# Altium PCB Shield_PCB.PcbDoc
Units mil, origin at the board's own origin, x right, y up, seen from the top; angles counter-clockwise.
Board outline 2762.03 x 3428.03 mil, 2 copper layers (Top Layer, Bottom Layer); 11 components, 18 nets, 73 pads, 66 vias.
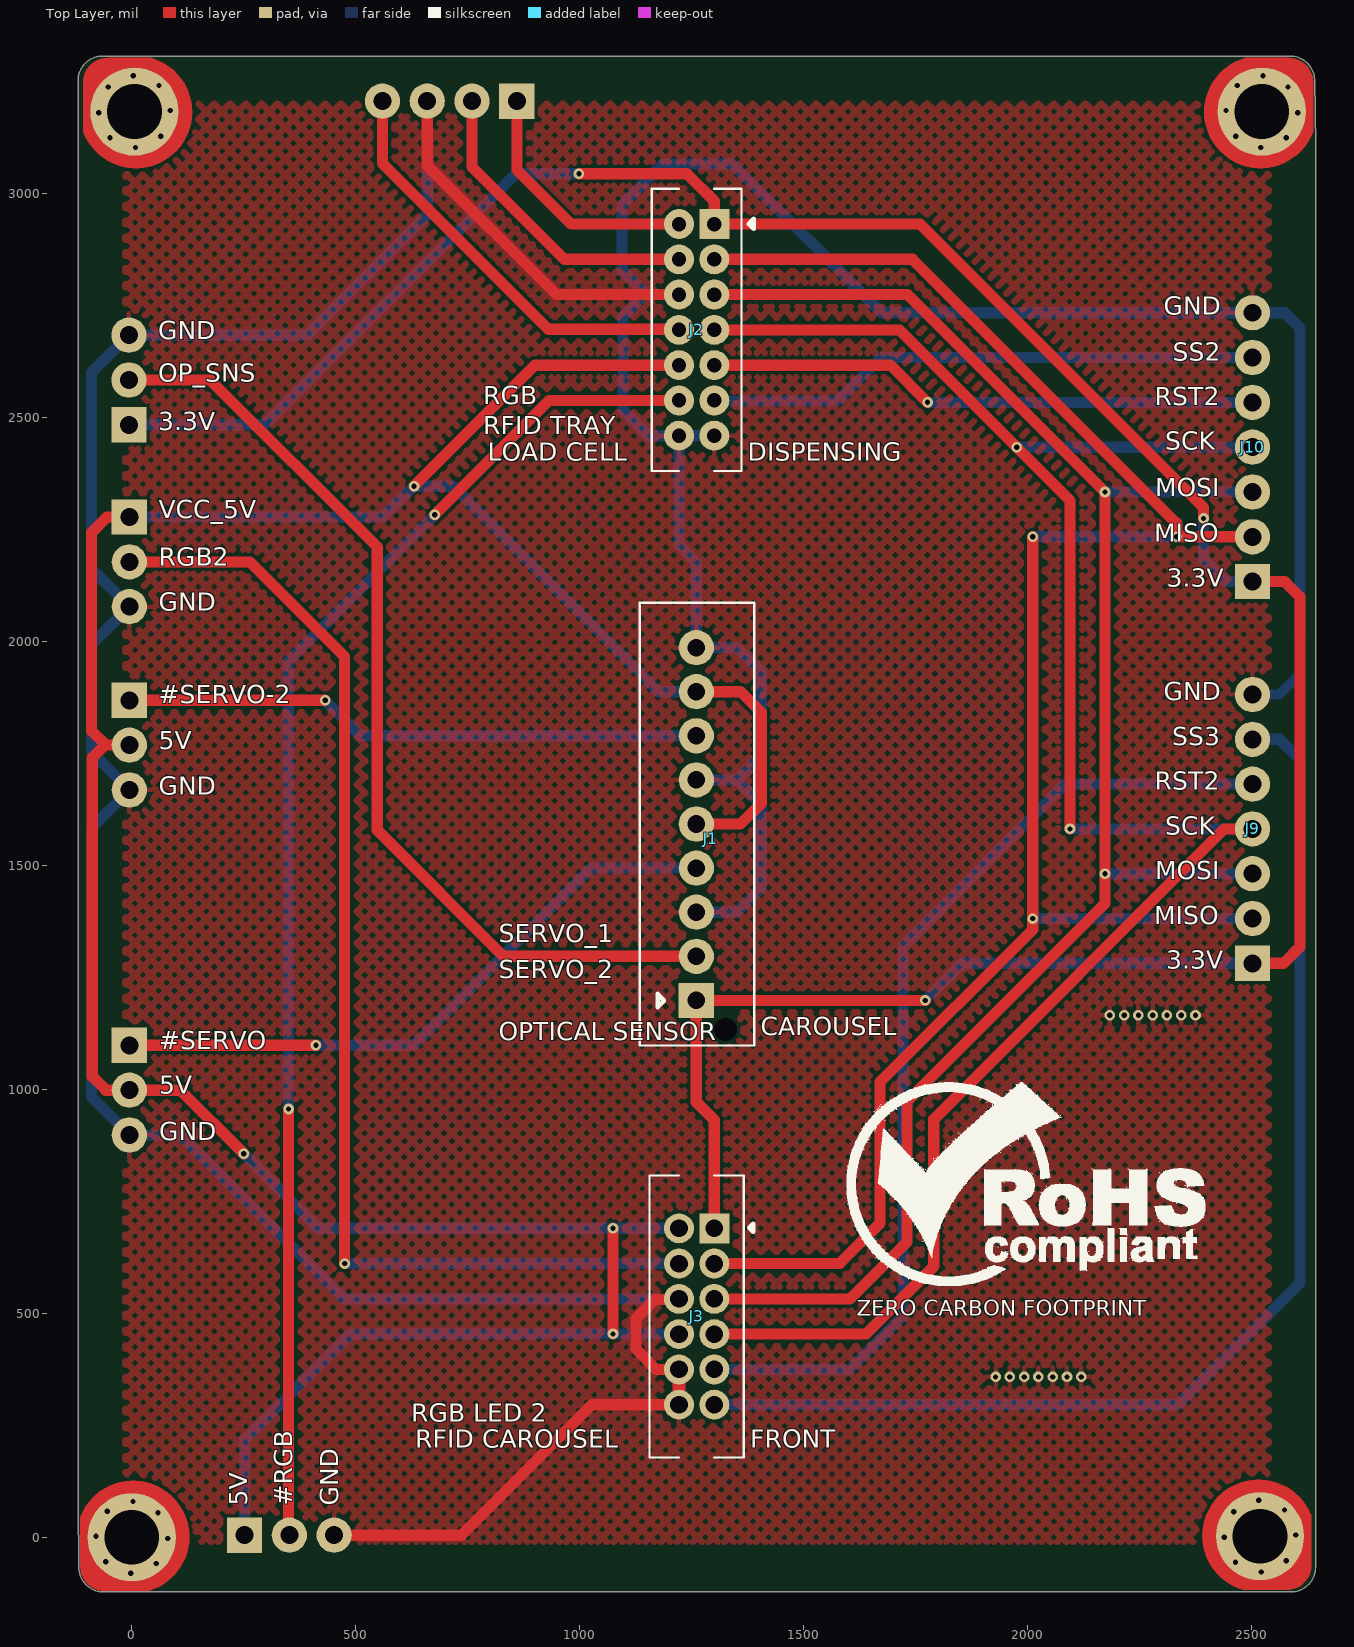
[diagram p0: Top Layer view]
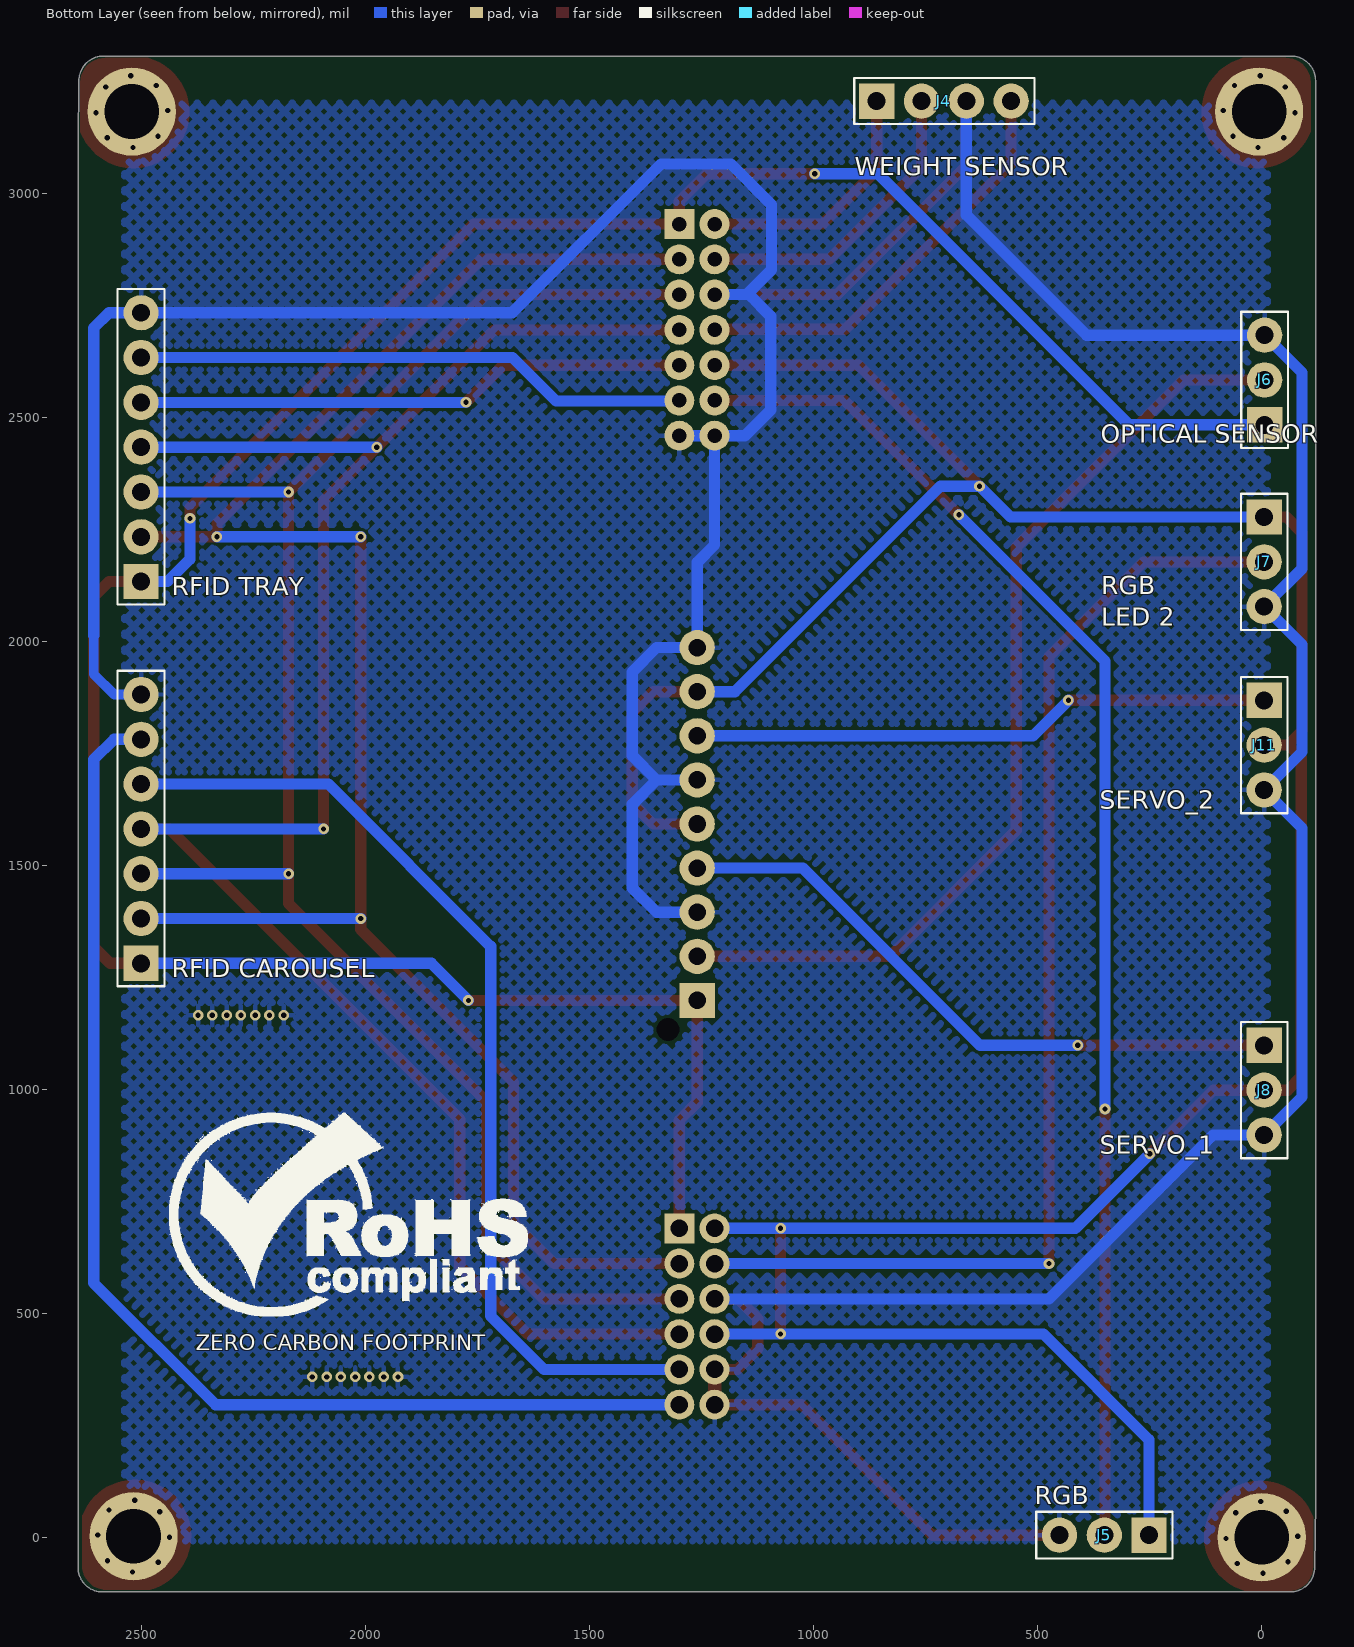
[diagram p1: Bottom Layer view, seen from below]
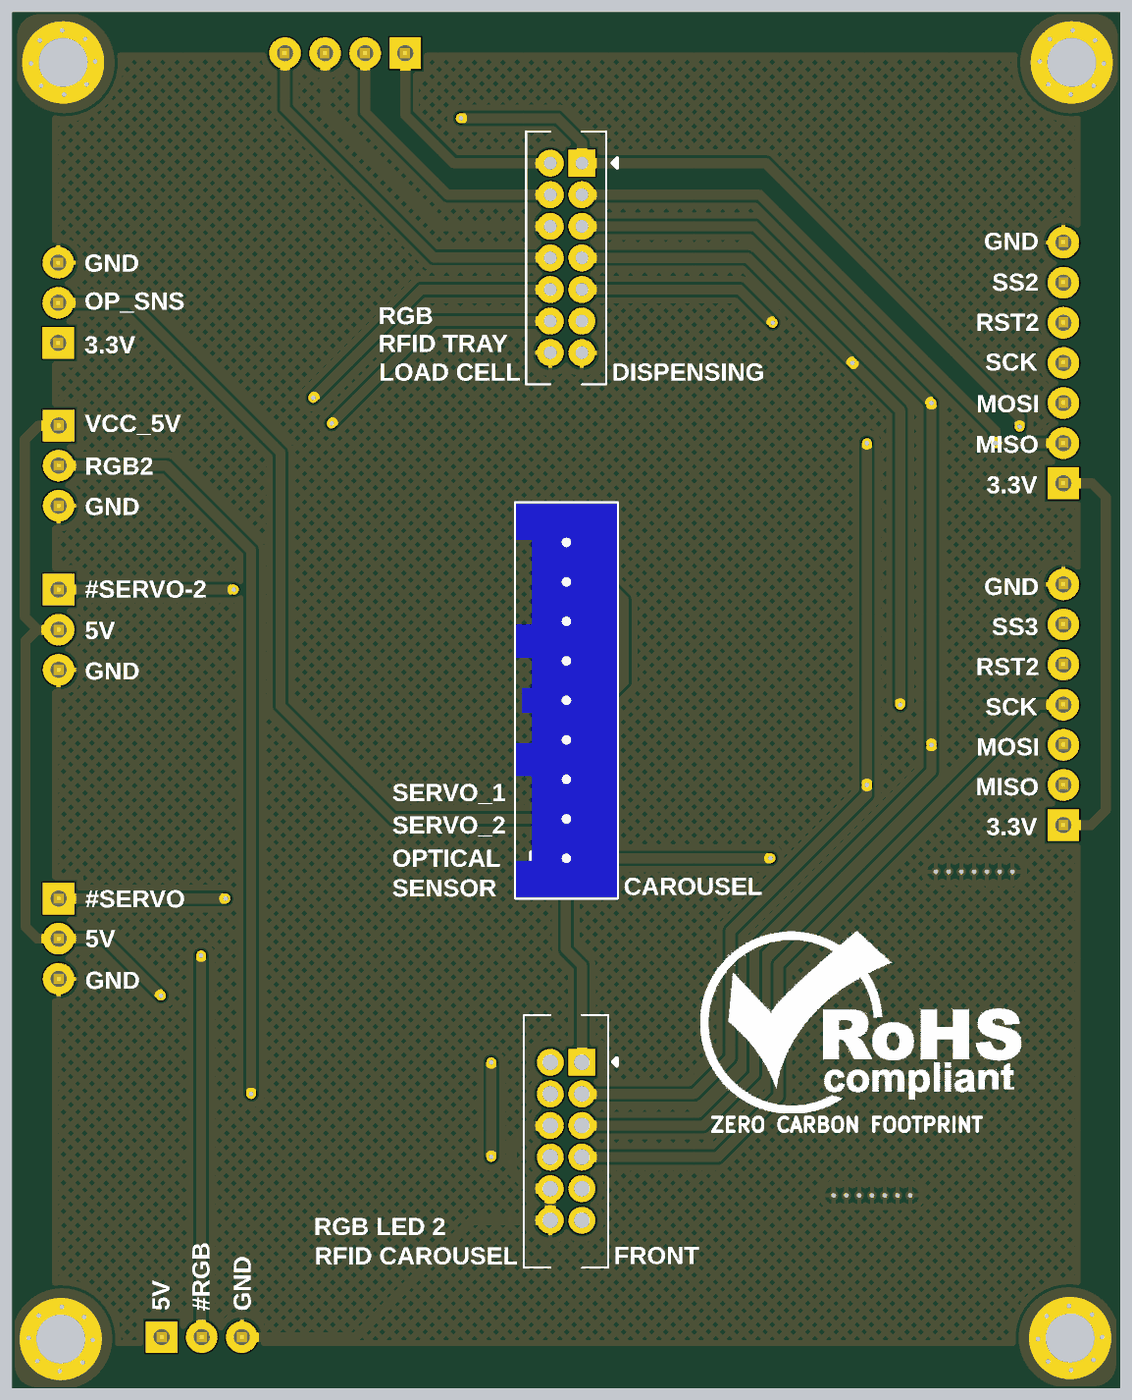
[diagram p2: 3D render of the assembled board from above, using the file's embedded part models]
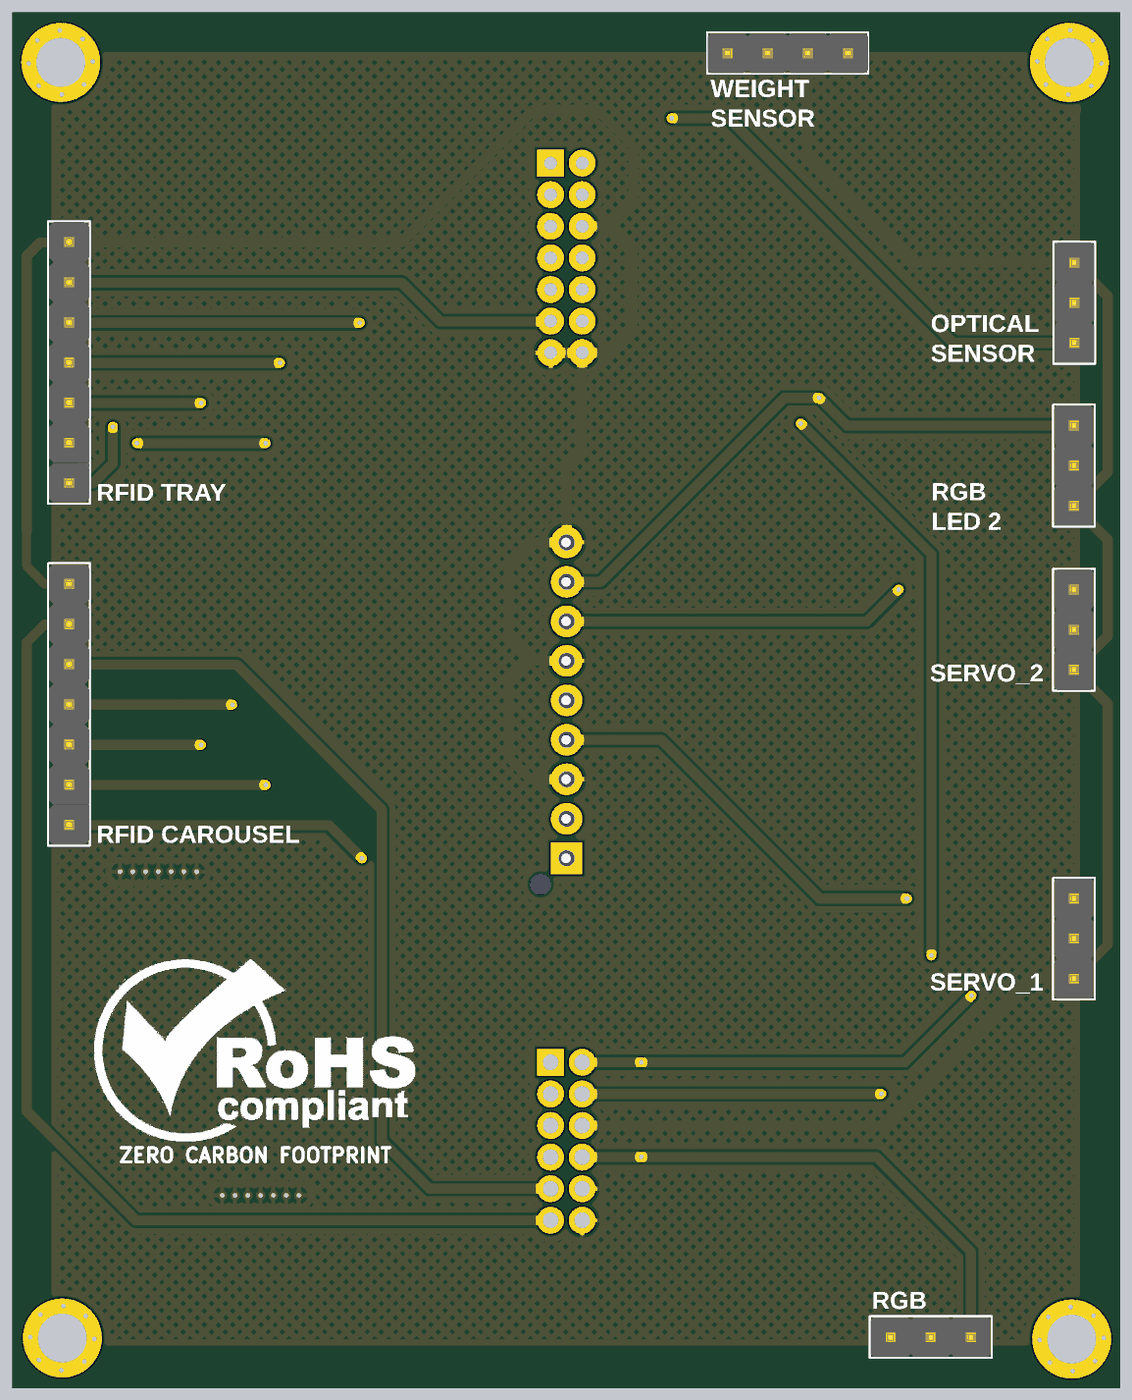
[diagram p3: 3D render of the assembled board from below, using the file's embedded part models]

## Layer stack, top to bottom
Top Solder: solder mask 0.4, Solder Resist, Dk 3.5
Top Layer: signal copper 1.4
Dielectric 1: dielectric 12.6, FR-4, Dk 4.8
Bottom Layer: signal copper 1.4
Bottom Solder: solder mask 0.4, Solder Resist, Dk 3.5

## Board outline
-118.01,-66.07 -120.01,75.92 cw(c-115,76) -120.01,75.93 -120.01,75.92 -120.01,75.93 cw(c-115,76) -120.02,76 -120.02,3251 cw(c-65,3251) -65,3306.02 2585,3306.02 cw(c2585,3251) 2639.94,3253.86 cw(c2635,3253) 2640.01,3253.07 2642.01,3108.08 cw(c2637,3108) 2642.01,3108 2642.01,-67 2642.02,-67 ccw(c2637,-67) 2642.01,-66.97 2642.02,-67 cw(c2587,-67) 2587,-122.02 cw(c2587,-117) 2586,-121.91 cw(c2585,-117) 2585,-122.02 -63,-122.02 cw(c-63,-67) -118.02,-67 cw(c-113,-67) -117.99,-66.5 cw(c-113,-66)

## Design rules (kind name [scope] priority, off if disabled: settings)
Clearance [All] p1: gap=7 ignorepadtopadclearanceinfootprint=FALSE
ComponentClearance [All] p1: gap=0 collisioncheckmode=3 verticalgap=0 showdistances=FALSE
HoleSize [All] p1: absolutevalues=TRUE maxlimit=1000 minlimit=1 maxpercent=80.000 minpercent=20.000
HoleToHoleClearance [All] p1: gap=0 allowstackedmicrovias=TRUE
MinimumSolderMaskSliver [All] p1: minsoldermaskwidth=0
PolygonConnect [All] p1: connectstyle=Relief reliefconductorwidth=10 reliefentries=4 polygonreliefangle="90 Angle" airgapwidth=10
RoutingVias [All] p1: holewidth=11.81 width=23.62 viastyle="Through Hole" minholewidth=11.81 minwidth=23.62 maxholewidth=11.81 maxwidth=23.62
SilkToSilkClearance [All] p1: silktosilkclearance=0
SilkToSolderMaskClearance [IsPad] p1: minsilkscreentomaskgap=0 clearancetoexposedcopper=TRUE
SolderMaskExpansion [All] p1: expansion=4 istentingtop=FALSE
Width [All] p1: maxlimit=50 minlimit=10 preferedwidth=22 minimp=50.000000 maximp=50.000000 favimp=50.000000
24 further rules are at their usual default settings.

## Components (designator, comment, footprint, x,y, rotation, side; value= is the part's Value field where it differs from the comment)
J1 "B09B-XASK-1-A(LF)(SN)" B09B-XASK-1-A(LF)(SN) 1292.5,1565.8 r270 top locked
J2 "PHD-2*7A" PHD-2*7A 1300,2931 r90 top locked
J3 "X2026WV-2x06A-N0SN" X2026WV-2x06A-N0SN 1300,689.7 r90 top locked
J4 "HDR_M_1X4" HDR_M_1X4 859.43,3205.18 r180 bottom locked
J5 "HDR_M_1X3" HDR_M_1X3 351.59,4.84 r0 bottom locked
J6 "HDR_M_1X3" HDR_M_1X3 -6.33,2583 r90 bottom locked
J7 "HDR_M_1X3" HDR_M_1X3 -5.33,2177 r270 bottom locked
J8 "HDR_M_1X3" HDR_M_1X3 -5.33,998 r270 bottom locked
J9 "HDR_M_1X7" HDR_M_1X7 2501.23,1281 r90 top locked
J10 "HDR_M_1X7" HDR_M_1X7 2501.23,2133 r90 top locked
J11 "HDR_M_1X3" HDR_M_1X3 -5.33,1768 r270 bottom locked

## Footprints (in the part's own frame and the unit in brackets; to place one, negate y for a bottom-side part, rotate by r counter-clockwise, add the part's x,y. Pads: shape width x height; smd on the part's side, far side on the other; paste and mask are expansions set on the pad)
B09B-XASK-1-A(LF)(SN) [mm]
  rect 2x2 hole 1: 1(9.335,-0.825)
  round 2 hole 1: 2(6.834,-0.825) 3(4.334,-0.825) 4(1.834,-0.825) 5(-0.666,-0.826) 6(-3.166,-0.826) 7(-5.666,-0.826) 8(-8.166,-0.826) 9(-10.666,-0.826)
  round 0 hole 1.3 unplated: MH1(10.986,0.826)
  silkscreen extent -13.21,-4.04 11.89,2.46, body extent -13.16,-3.99 11.84,2.41, height 8.8
HDR_M_1X3 [mm] "2.54mm spacer header"
  rect 2x2 hole 1.02: 1(-2.54,0)
  round 2 hole 1.02: 2(0,0) 3(2.54,0)
  silkscreen extent -3.86,-1.32 3.86,1.32, body extent -3.81,-1.27 3.81,1.27, height 11.93
HDR_M_1X4 [mm] "2.54mm spacer header"
  rect 2x2 hole 1.02: 1(0,0)
  round 2 hole 1.02: 2(2.54,0) 3(5.08,0) 4(7.62,0)
  silkscreen extent -1.27,-1.3 8.94,1.32, body extent -1.25,-1.27 8.92,1.27, height 11.93
HDR_M_1X7 [mm] "2.54mm Board Spacer Pin Header"
  rect 2x2 hole 1.02: 1(0,0)
  round 2 hole 1.02: 2(2.54,0) 3(5.08,0) 4(7.62,0) 5(10.16,0) 6(12.7,0) 7(15.24,0)
  body extent -1.25,-1.27 16.54,1.27, height 2.77
PHD-2*7A [mm]
  rect 1.7x1.7 hole 0.82: 1(0,0)
  round 1.7 hole 0.82: 2(-2,0) 3(-4,0) 4(-6,0) 5(-8,0) 6(-10,0) 7(-12,0) 8(0,2) 9(-2,2) 10(-4,2) 11(-6,2) 12(-8,2) 13(-10,2) 14(-12,2)
  silkscreen extent -14,-2.24 2,3.54
X2026WV-2x06A-N0SN [mm]
  rect 1.7x1.7 hole 1: 1(0,0)
  round 1.7 hole 1: 2(0,2) 3(-2,0) 4(-2,2) 5(-4,0) 6(-4,2) 7(-6,0) 8(-6,2) 9(-8,0) 10(-8,2) 11(-10,0) 12(-10,2)
  silkscreen extent -13,-2.21 3,3.67

## Part data
J1: "CONN HEADER VERT 9POS 2.5MM", Current Rating=3A, Manufacturer=JST, Max Operating Temperature=85°C, Min Operating Temperature=-25°C, Supplier Part Number 1=455-4123-ND, Category=Connectors, Contact Plating=Copper,Tin,Lead, Height=8.8mm, Length=25mm, Manufacturer Part Number=B09B-XASK-1-A(LF)(SN), Number of Poles=9, Pitch=2.5mm, Pricing 1="1=0.50000, 10=0.43900, 100=0.36160, 500=0.31446, 1000=0.25942, 5000=0.22798, 10000=0.21226 (USD)", RoHS=Yes, Shape=Straight, Supplier 1=Digi-Key, Width=6.4mm
J2: "2x7P 2 PHD 2mm 2mm 7 Phosphor bronze Plugin,P=2mm Wire To Board / Wire To Wire Connector ROHS", Manufacturer=BOOMELE, Package=Custom, ComponentLink1Description=LCSC, ComponentLink1URL=https://lcsc.com/product-detail/Wire-To-Board-Wire-To-Wire-span-style-background-color-ff0-Connector-span_BOOMELE-Boom-Precision-Elec-PHD-2-7A_C40745.html, Manufacturer Part No=PHD-2*7A
J3: "2x6P 2 2mm 2mm 6 Brass Plugin,P=2mm Wire To Board / Wire To Wire Connector ROHS", Manufacturer=XKB-Connectivity, Package=Custom, ComponentLink1Description=LCSC, ComponentLink1URL=https://lcsc.com/product-detail/Wire-To-Board-Wire-To-Wire-span-style-background-color-ff0-Connector-span_XKB-Connectivity-X2026WV-2x06A-N0SN_C725844.html, Manufacturer Part No=X2026WV-2x06A-N0SN
J4: "4 POS 2.54mm spacer header", Current Rating=1Amps, Manufacturer=E-SIMPO, ComponentLink1Description=AliE, ComponentLink1URL=c, Pitch=2.54mm
J5 J6 J7 J8 J11: "3 POS 2.54mm spacer header", Current Rating=1Amps, Manufacturer=E-SIMPO, ComponentLink1Description=AliE, ComponentLink1URL=https://www.aliexpress.com/item/32896225776.html?spm=a2g0o.productlist.0.0.64116a18Q9OFX2&algo_pvid=aef74b9f-f029-40ba-a87b-4c3df7d87b26&algo_exp_id=aef74b9f-f029-40ba-a87b-4c3df7d87b26-3&pdp_ext_f=%7B%22sku_id%22%3A%2265850500267%22%7D&pdp_pi=-1%3B2.79%3B-1%3BUSD+3.72%40salePrice%3BUSD%3Bsearch-mainSearch, Pitch=2.54mm
J9 J10: "7 POS 2.54mm Board Spacer Pin", Current Rating=1Amps, Manufacturer=E-SIMPO, ComponentLink1Description=AliE, ComponentLink1URL=https://www.aliexpress.com/item/32896225776.html?spm=a2g0o.productlist.0.0.64116a18Q9OFX2&algo_pvid=aef74b9f-f029-40ba-a87b-4c3df7d87b26&algo_exp_id=aef74b9f-f029-40ba-a87b-4c3df7d87b26-3&pdp_ext_f=%7B%22sku_id%22%3A%2265850500267%22%7D&pdp_pi=-1%3B2.79%3B-1%3BUSD+3.72%40salePrice%3BUSD%3Bsearch-mainSearch, Pitch=2.54mm

## Free pads (board coordinates)
  round 196.85 hole 122.05: MH1(6,3182) MH2(2522,3182) MH3(2518,2.51) MH4(0,0)

## Via types
v1: diameter 23.62, hole 11.81, Top Layer to Bottom Layer, 34 vias
v2: diameter 23.62, hole 11.81, Top Layer to Bottom Layer, tented both sides, 32 vias

## Nets (pads, with @x,y where several pads share a name; then routed paths per layer and width w, separated by ;. In a path a pad name is that pad's centre, name@x,y a point inside that pad or via, vN(x,y) a via of type N, cw(c..) or ccw(c..) an arc to the next point about the centre after c; other vN are vias at no path point)
#RGB: J2.13 J5.2 | length 3063.9
  Top Layer w25: v1(350,956) 350,6.43 J5.2 ; v1(676,2282) 931.3,2537.3 J2.13
  Bottom Layer w25: v1(350,956) 350,1956 v1(676,2282)
#RGB2: J3.4 J7.2 | length 2669
  Top Layer w25: J7.2 264,2177 475,1966 v1(475,610.96)
  Bottom Layer w25: v1(475,610.96) J3.4
#SERVO: J1.4 J8.1 | length 1429.2
  Top Layer w25: J8.1 v1(411,1098)
  Bottom Layer w25: v1(411,1098) 629,1098 1024.58,1493.58 J1.4
#SERVO_2: J1.7 J11.1 | length 1298.1
  Top Layer w25: J11.1 v1(431.56,1868)
  Bottom Layer w25: v1(431.56,1868) 510.71,1788.85 J1.7
AVDD#: J2.11 J4.4 | length 954.4
  Top Layer w10: J2.11@1220.04,2696 J2.11
  Top Layer w25: J4.4 559.43,3066.57 930,2696 J2.11@1220.04,2696
GND: J1.3 J1.6 J1.9 J2.7 J2.10 J2.14 J3.6 J3.10 J3.12 J4.3 J5.3 J6.3 J7.3 J8.3 J9.7 J10.7 J11.3 | length 11341.2
  Top Layer w22: J3.6@1219.83,530.8 J3.6
  Top Layer w25: J5.3 735.84,4.84 1027,296 J3.12 ; J4.3 659.43,3061.57 947.48,2773.52 J2.10 ; J3.6@1219.83,530.8 1167.8,530.8 1125,488 1125,420 1170.26,374.74 J3.10
  Top Layer w30: J3.12 J3.10
  Bottom Layer w22: J9.7 2561,1881 2607,1927 2607,2013
  Bottom Layer w25: J4.3 659.43,2951.43 391,2683 J6.3 -90,2599.33 -90,2161.67 J7.3 -90,1992.33 -90,1752.67 J11.3 -90,1583.33 -90,982.67 J8.3 109,898 474.78,532.22 J3.6 ; J2.10 1149.48,2773.52 ; J1.3 1350.57,1395.15 1405,1449.58 1405,1636 1350.57,1690.43 ; J1.6 1350.57,1690.43 ; J2.7 J2.14 ; 2607,2013 2607,2699 2573,2733 J10.7 1673,2733 1341,3065 1185,3065 1094,2974 1094,2829 1149.48,2773.52 ; 1149.48,2773.52 1144.52,2773.52 1096,2725 1096,2516 1153.44,2458.56 J2.14 ; J2.14 1221.26,2214.74 1260,2176 J1.9 1350.57,1985.71 1405,1931.28 1405,1744.86 1350.57,1690.43
  other v1: 1927.87,358 1959.73,358 1991.58,358 2023.44,358 2055.29,358 2087.15,358 2119,358 2182.87,1165 2214.73,1165 2246.58,1165 2278.44,1165 2310.29,1165 2342.15,1165 2374,1165
IN_NA: J2.9 J4.2 | length 693.9
  Top Layer w25: J4.2 759.43,3058.57 965.74,2852.26 J2.9
IN_PA: J2.8 J4.1 | length 565.4
  Top Layer w25: J4.1 859.43,3051.57 980,2931 J2.8
MISO: J2.2 J3.3 J9.2 J10.2 | length 4367.1
  Top Layer w25: J3.3 1579.96,610.96 1670,701 1670,1016 2011,1357 v1(2011,1381) v1(2011,2233) ; J2.2 1742.74,2852.26 2332,2263 v1(2332,2233) J10.2
  Bottom Layer w25: v1(2011,1381) J9.2 ; v1(2011,2233) v1(2332,2233)
MOSI: J2.3 J3.5 J9.3 J10.3 | length 4052.5
  Top Layer w25: J3.5 1603.22,532.22 1730,659 1730,973 2172,1415 v1(2172,1481) v1(2172,2333) 1731.48,2773.52 J2.3
  Bottom Layer w25: v1(2172,1481) J9.3 ; v1(2172,2333) J10.3
OP_SNS: J1.2 J6.2 | length 2169.3
  Top Layer w25: J6.2 175,2583 548,2210 548,1578 829.27,1296.73 J1.2
RST2: J2.5 J10.5 | length 1235.6
  Top Layer w25: J2.5 1692.96,2616.04 v1(1776,2533)
  Bottom Layer w25: v1(1776,2533) J10.5
RST3: J3.9 J9.5 | length 2225.6
  Bottom Layer w25: J3.9 1601.74,374.74 1721,494 1721,1319 2083,1681 J9.5
SCK: J2.4 J3.7 J9.4 J10.4 | length 4478.6
  Top Layer w25: J3.7 1638.48,453.48 1790,605 1790,933 2438,1581 J9.4 ; J2.4 1713.22,2694.78 v1@1972,2436 ; v1(1975,2433) 2094,2314 v1(2094,1581)
  Bottom Layer w10: J10.4@2498.23,2436 J10.4
  Bottom Layer w25: v1(1975,2433) J10.4 ; v1(2094,1581) J9.4
SS2: J2.6 J10.6 | length 1242
  Bottom Layer w10: J2.6 J2.6@1301.3,2536
  Bottom Layer w25: J2.6@1301.3,2536 1575,2536 1672,2633 J10.6
SS3: J3.11 J9.6 | length 2712.1
  Bottom Layer w25: J3.11 2335,296 2607,568 2607,1736 2562,1781 J9.6
VCC_3V3: J1.1 J2.1 J3.1 J6.1 J9.1 J10.1 | length 6036.3
  Top Layer w25: v1(998,3043) 1239,3043 1300,2982 J2.1 1759,2931 2392,2298 v1(2392,2274) ; J3.1 1300,931 1260,971 J1.1 v1(1770.7,1198.3) ; J9.1 2570,1281 2607,1318 2607,2099 2573,2133 J10.1
  Bottom Layer w25: J6.1 296,2483 856,3043 v1(998,3043) ; v1(1770.7,1198.3) 1853.39,1281 J9.1 ; v1(2392,2274) 2392,2183 2442,2133 J10.1
VCC_5V: J1.5 J1.8 J2.12 J3.2 J3.8 J5.1 J7.1 J8.2 J11.2 | length 7080.1
  Top Layer w25: J11.2 -58,1768 ; J7.1 -55,2277 -90,2242 -90,1800 -58,1768 ; J5.1@250,6.43 J5.1 ; v1(250,856) 108,998 J8.2 -58,998 -88,1028 -88,1740 -60,1768 -58,1768 ; v1(630,2346) 900.04,2616.04 J2.12 ; v1(1074,454) v1(1074,689.7) ; J1.5 1358.72,1592 1405,1638.28 1405,1841 1358.72,1887.28 J1.8
  Bottom Layer w22: J1.8@1258.72,1886 J1.8
  Bottom Layer w25: J7.1 561,2277 v1(630,2346) 717,2346 1175.72,1887.28 J1.8 ; v1(250,856) 416.3,689.7 v1(1074,689.7) J3.2 ; J5.1 251.59,217.59 487.48,453.48 J3.8
pads on no net: J1.MH1
copper on no net: | length 73.1
  Bottom Layer w40: 0,0 v2@51.71,-51.71
  other v2: -2.51,-80 2520.51,-77.49 54.8,-58.34 2463.2,-55.83 -58.34,-54.8 2576.34,-52.29 80,-2.51 2438,0 -80,2.51 2598,5.01 58.34,54.8 2459.66,57.3 -54.8,58.34 2572.8,60.85 2.51,80 2515.49,82.51 8.51,3102 2519.49,3102 -48.8,3123.66 2576.8,3123.66 64.34,3127.2 2463.66,3127.2 -74,3179.49 2602,3179.49 86,3184.51 2442,3184.51 -52.34,3236.8 2580.34,3236.8 60.8,3240.34 2467.2,3240.34 3.49,3262 2524.51,3262

## Polygon pours and split planes (outlines as drawn)
no net on Mechanical 2 (solid): 315,-21
GND on Top Layer "Polygon_1" (hatched 45Degree grid 25 track 15, remove dead copper, pour order 0): -14,-9.18 ccw(c-13,-9.18) -13,-10.18 2437,-10.18 ccw(c2437,89.82) 2537,89.82 2537,3196 cw(c2540,3196) 2540,3199 -14,3199 ccw(c-14,3197) -16,3197 -16,3058 ccw(c-14,3058) -14,3056
GND on Bottom Layer "Polygon_2" (hatched 45Degree grid 25 track 15, remove dead copper, pour order 2): -13,-7.18 ccw(c-12,-7.18) -12,-8.18 2438,-8.18 ccw(c2438,91.82) 2538,91.82 2538,3198 cw(c2541,3198) 2541,3201 -13,3201 ccw(c-13,3199) -15,3199 -15,3060 ccw(c-13,3060) -13,3058

## Other copper
Top Layer:
  region: 2632.7,-62.49 2632.7,47.15 ccw(c2627.69,47.15) 2631.33,50.59 ccw(c2515,3.51) 2389.5,3.51 ccw(c2515,3.51) 2480.93,-117.28 ccw(c2482.29,-112.46) 2482.63,-117.46 ccw(c2483.33,-112.49) 2483.33,-117.51 2577.69,-117.51 ccw(c2577.69,-62.49)
  region: -114.7,-65 -114.7,44.64 cw(c-109.69,44.64) -113.33,48.08 cw(c3,1) 128.5,1 cw(c3,1) 37.07,-119.79 cw(c35.71,-114.96) 35.37,-119.97 cw(c34.67,-115) 34.67,-120.02 -59.69,-120.02 cw(c-59.69,-65)
  region: 2636.7,3247 2636.7,3137.36 cw(c2631.69,3137.36) 2635.33,3133.92 cw(c2519,3181) 2393.5,3181 cw(c2519,3181) 2484.93,3301.79 cw(c2486.29,3296.96) 2486.63,3301.97 cw(c2487.33,3297) 2487.33,3302.02 2581.69,3302.02 cw(c2581.69,3247)
  region: -108.7,3247 -108.7,3137.36 ccw(c-103.69,3137.36) -107.34,3133.92 ccw(c9,3181) 134.5,3181 ccw(c9,3181) 43.07,3301.79 ccw(c41.71,3296.96) 41.37,3301.97 ccw(c40.67,3297) 40.67,3302.02 -53.69,3302.02 ccw(c-53.69,3247)

## Silkscreen, mask and mechanical layers (free items; w line width, h text height)
Top Overlay:
  drawing of 3054 lines, arcs and shapes, not listed
  text "GND" at 2303,2715 h70
  text "GND" at 58.67,2660.49 h70
  text "SS2" at 2323,2613 h70
  text "OP_SNS" at 58.96,2566 h70
  text "RGB" at 784,2515.18 h70
  text "RST2" at 2283,2513 h70
  text "3.3V" at 59.19,2457 h70
  text "RFID TRAY" at 784,2448 h70
  text "SCK" at 2306,2414 h70
  text "LOAD CELL" at 794,2389 h70
  text "DISPENSING" at 1375,2389 h70
  text "MOSI" at 2284,2310 h70
  text "VCC_5V" at 60,2261 h70
  text "MISO" at 2282,2209 h70
  text "RGB2" at 60,2154.73 h70
  text "3.3V" at 2309.44,2108 h70
  text "GND" at 60,2054 h70
  text "GND" at 2303.29,1854.49 h70
  text "#SERVO-2" at 60,1848 h70
  text "SS3" at 2322.29,1754.66 h70
  text "5V" at 60,1745 h70
  text "RST2" at 2283.29,1654.83 h70
  text "GND" at 60,1644 h70
  text "SCK" at 2306.29,1554.99 h70
  text "MOSI" at 2284.29,1455.16 h70
  text "MISO" at 2282.29,1355.33 h70
  text "SERVO_1" at 818.61,1315 h70
  text "3.3V" at 2309,1256 h70
  text "SERVO_2" at 818.61,1234 h70
  text "CAROUSEL" at 1404,1107 h70
  text "OPTICAL SENSOR" at 818.61,1096 h70
  text "#SERVO" at 61,1076 h70
  text "5V" at 60.8,977 h70
  text "GND" at 60.8,873 h70
  text "ZERO CARBON FOOTPRINT" at 1618,494 h35
  text "RGB LED 2" at 623.58,245 h70
  text "FRONT" at 1380,187 h70
  text "RFID CAROUSEL" at 633.18,186.13 h70
  text "5V" at 271,71 h70 r90
  text "#RGB" at 371,70 h70 r90
  text "GND" at 474,70 h70 r90
Bottom Overlay:
  drawing of 3054 lines, arcs and shapes, not listed
  text "WEIGHT SENSOR" at 909,3026 h70
  text "OPTICAL SENSOR" at 360,2429 h70
  text "RFID TRAY" at 2433,2089 h70
  text "RGB / LED 2" at 358,2021 h70
  text "SERVO_2" at 362,1613 h70
  text "RFID CAROUSEL" at 2433,1237 h70
  text "SERVO_1" at 362,843 h70
  text "ZERO CARBON FOOTPRINT" at 2379,418 h35
  text "RGB" at 506.59,60.84 h70
Mechanical 2:
  lines w10: -113,-67 ccw(c-63,-67) -63,-117 ; -113,-66 -115,76 -115,3251 cw(c-65,3251) -65,3301 100,3301 2585,3301 cw(c2585,3251) 2635,3251 ; 2585,-117 2427,-117 102,-117 ; 2587,-117 ccw(c2587,-67) 2637,-67 2637,66.17 2637,3108 2635,3253 ; -63,-117 -56,-117 ; -63,-117 -56,-117 ; -56,-117 102,-117 ; -56,-117 102,-117

## Dimensions
2635,3253 to -115,3251 on Mechanical 1
-65,3301 to -56,-117 on Mechanical 1